# Altium PCB switch-box.PcbDoc (part 2 of 2)
Units mil, origin at the board's own origin, x right, y up, seen from the top; angles counter-clockwise.
Board outline 6910 x 3465 mil, 2 copper layers (Top Layer, Bottom Layer), stack 57 mil thick; 96 components, 105 nets, 379 pads, 100 vias.
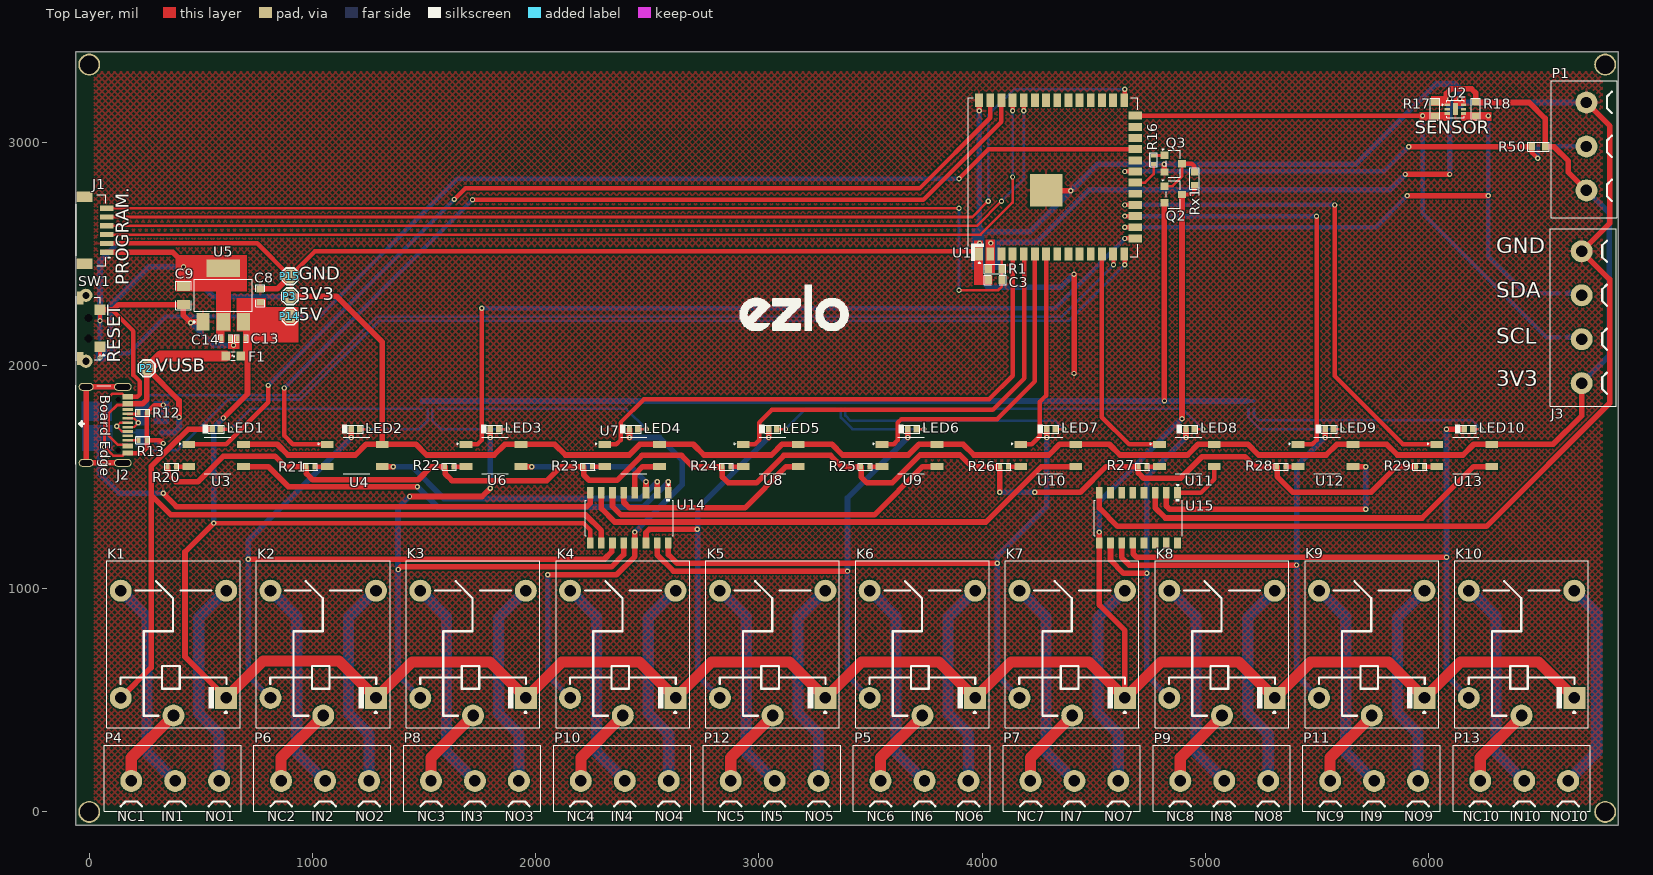
[diagram p0: Top Layer view]

## Part data (continued)
U3 U4 U6 U7 U8 U9 U10 U11 U12 U13: "Optoisolator Transistor Output 3750Vrms 1 Channel", Case/Package=SMD/SMT, Collector Emitter Saturation Voltage=200mV, Collector Emitter Voltage (VCEO)=80V, Current Transfer Ratio=600%, Forward Current=50mA, Forward Voltage=1.4V, Isolation Voltage=3.75kV, LCSC Part Number=C84196, Manufacturer=Isocom, Max Operating Temperature=100°C, Min Operating Temperature=-55°C, Power Dissipation=170mW, Reverse Breakdown Voltage=6V, Category=Optocouplers, ComponentLink1Description=https://datasheet.ciiva.com/26895/getdatasheetpartid-624485-26895717.pdf?src-supplier=Verical, ComponentLink1URL=https://datasheet.ciiva.com/26895/getdatasheetpartid-624485-26895717.pdf?src-supplier=Verical, ComponentLink2Description=https://datasheet.ciiva.com/29301/183289-da-01-en-optokoppler-is181-gb-29301106.pdf?src-supplier=Conrad, ComponentLink2URL=https://datasheet.ciiva.com/29301/183289-da-01-en-optokoppler-is181-gb-29301106.pdf?src-supplier=Conrad, Fall Time=18000ns, Item Type=Optocoupler, Lead Free="Lead Free", Manufacturer Part Number=IS181GB, Mount="Surface Mount", Number of Elements=1, Number of Pins=4, Pricing 1="1=0.55080, 10=0.34190, 25=0.33860, 50=0.33530, 100=0.19360, 250=0.19160, 500=0.18960, 1000=0.14750 (USD)", Radiation Hardening=No, Rise Time=18000ns, RoHS=Yes, RoHS Compliant=Yes, Stock 1=2922, Supplier 1="Arrow Electronics", Supplier Part Number 1=IS181GB
U5: "IC REG LINEAR 3.3V 1.2A SOT223", Case/Package=TO-261-4, Dropout Voltage=600mV, LCSC Part Number=C435835, Manufacturer=STMicroelectronics, Max Input Voltage=18V, Max Operating Temperature=125°C, Min Operating Temperature=-40°C, Min Output Voltage=3.3V, Output Current=1.2A, Power Supply Rejection Ratio (PSRR)=65dB, Quiescent Current=500uA, Supplier Part Number 1=497-17239-6-ND, ComponentLink1Description=LCSC, ComponentLink1URL=https://www.lcsc.com/product-detail/Linear-Voltage-Regulators-LDO_STMicroelectronics-LDL1117S33R_C435835.html, Manufacturer Part Number=LDL1117S33R, Mount="Surface Mount", Number of Regulators=1, Output Configuration=Positive, Output Type=Fixed, Packaging="Tape and Reel", Pricing 1="1=0.45, 10=0.362, 100=0.2465, 500=0.1849, 1000=0.13867 (USD)", Stock 1=13064, Supplier 1=Digi-Key
U14 U15: "TRANS 7NPN DARL 50V 0.5A 16SOIC", Case/Package=SOIC, Collector Emitter Breakdown Voltage=50V, Collector Emitter Saturation Voltage=1.1V, Collector-emitter Voltage-Max=1.6V, Current Rating=500mA, LCSC Part Number=C908113, Manufacturer="Texas Instruments", Max Operating Temperature=70°C, Max Power Dissipation=25W, Min Operating Temperature=-20°C, Package Quantity=40, Category="Integrated Circuits (ICs)", Collector Emitter Voltage (VCEO)=50V, ComponentLink1Description=https://datasheet.ciiva.com/15139/getdatasheetpartid-47909-15139875.pdf?src-supplier=Verical, ComponentLink1URL=https://datasheet.ciiva.com/15139/getdatasheetpartid-47909-15139875.pdf?src-supplier=Verical, ComponentLink2Description=https://datasheet.ciiva.com/1193/1908148-1193405.pdf?src-supplier=Element14, ComponentLink2URL=https://datasheet.ciiva.com/1193/1908148-1193405.pdf?src-supplier=Element14, ComponentLink3Description=https://datasheet.ciiva.com/1702/uln2003a-1702173.pdf?src-supplier=Digi-Key, ComponentLink3URL=https://datasheet.ciiva.com/1702/uln2003a-1702173.pdf?src-supplier=Digi-Key, ComponentLink4Description=https://datasheet.ciiva.com/14424/ulq2003a-14424058.pdf?src-supplier=Avnet, ComponentLink4URL=https://datasheet.ciiva.com/14424/ulq2003a-14424058.pdf?src-supplier=Avnet, Contact Plating=Gold, Emitter Base Voltage (VEBO)=50V, Height=1.58mm, Item Type=IC, Lead Free="Lead Free", Length=9.9mm, Manufacturer Part Number=ULN2003AD, Max Collector Current=500mA, Mount="Surface Mount", Number of Drivers=7, Number of Elements=7, Number of Pins=16, Output Current=500mA, Packaging=Rail/Tube, Polarity=NPN, Pricing 1="1=1.68680, 10=1.54200, 100=1.39890, 500=1.31050, 1000=1.23410 (USD)", Radiation Hardening=No, Reach SVHC Compliant=Yes, RoHS=Yes, RoHS Compliant=Yes, Series="Automotive, AEC-Q100", Stock 1=228, Supplier 1="Arrow Electronics", Supplier Part Number 1=ULN2003AD, Voltage Rating (DC)=50V, Weight=0.004998oz, Width=3.91mm

## Free pads (board coordinates)
  round 98.43 hole 82.68: MH1(0,3348) MH2(0,0) MH3(6791,0) MH3(6791,3348)

## Via types
v1: diameter 23.62, hole 11.81, Top Layer to Bottom Layer, tented both sides, 100 vias

## Nets (pads, with @x,y where several pads share a name; then routed paths per layer and width w, separated by ;. In a path a pad name is that pad's centre, name@x,y a point inside that pad or via, vN(x,y) a via of type N, cw(c..) or ccw(c..) an arc to the next point about the centre after c; other vN are vias at no path point)
3V3: C1.1 C2.1 C5.1 C9.1 C14.1 J1.1 J3.1 P1.1 P3.1 R1.2 R2.2 R17.2 R18.2 R50.2 U1.2 U2.1 U3.4 U4.4 U5.2 U5.4 U6.4 U7.4 U8.4 U9.4 U10.4 U11.4 U12.4 U13.4 | length 13717.9
  Top Layer w10: R17.2@6039.54,3168.15 U2.1
  Top Layer w25: J1.1 373.43,2507.57 422,2459 v1(422,2442) C9.1 ; U5.2 600.55,2357.55 ; U3.4 842.09,1647 890.09,1599 1192.33,1599 1240.33,1647 U4.4 ; v1(899,2308) 901,2310 1107,2310 1312.54,2104.46 U4.4 ; R1.2 4030.5,2434.5 4030.5,2455.5 ; U1.2@4033.18,2494.3 U1.2@4038.39,2499.51 ; v1(5896,2856) v1(6094,2856) ; 6080,3202 6080,3219 6100,3239 6193,3239 6211,3221 6211,3178 6451,3178 6522,3107 R50.2 6562,2980 6626,2916 6626,2865.3 P1.1 ; J3.1 6685.64,1774.64 6558,1647 U13.4 6202,1647 6154,1599 5860,1599 5812,1647 U12.4 5589,1647 5541,1599 5238.76,1599 5190.76,1647 U11.4 4967.76,1647 4919.76,1599 4617.52,1599 4569.52,1647 U10.4 4346.52,1647 4298.52,1599 3963,1599 3915,1647 U9.4 3717,1647 3669,1599 3375.05,1599 3327.05,1647 U8.4 3104.05,1647 3056.05,1599 2753.81,1599 2705.81,1647 U7.4 2467,1647 2419,1599 2132.57,1599 2084.57,1647 U6.4 1861.57,1647 1813.57,1599 1511.33,1599 1463.33,1647 U4.4
  Bottom Layer w25: R2.2 97,2274 265,2442 v1(422,2442) 556,2308 v1(899,2308) ; 4054,2552 4054.5,2552.5 4245.5,2552.5 4481,2788 5828,2788 v1(5896,2856) ; v1(6094,2856) v1(6094,3194) ; J3.1 6809,2044.23 6809,2682.3 P1.1
  other v1: 4038.39,2548.31
5V: C8.1 C13.1 F1.2 K1.1 K2.1 K3.1 K4.1 K5.1 K6.1 K7.1 K8.1 K9.1 K10.1 P14.1 Q2.3 Rx1.1 U5.3 U14.9 U15.9 | length 13300.1
  Top Layer w20: v1(558,1294) 2213,1294 2244,1263 U14.9 ; Q2.3 4939,2766 4951,2778 4951,2808 Rx1.1@4952,2809
  Top Layer w25: v1(558,1294) 429,1165 429,695.27 K1.1 ; v1(601,1765) 709,1873 709,2035 702,2042 F1.2 ; v1(4525,1253.8) U15.9 4525,927 4639.63,812.37 K7.1 ; v1(4895.37,1762) Q2.3
  Top Layer w50: K1.1 778.79,676 1119.29,676 K2.1 1445.81,672 1794.3,672 K3.1 2116.82,672 2465.32,672 K4.1 2787.84,672 3136.34,672 K5.1 3458.86,672 3807.35,672 K6.1 4129.87,672 4478.37,672 K7.1 4800.89,672 5149.39,672 K8.1 5471.91,672 5820.4,672 K9.1 6142.92,672 6491.42,672 K10.1
  Bottom Layer w25: v1(558,1294) 558,1722 v1(601,1765) ; v1(4525,1253.8) 4525,1391.63 v1(4895.37,1762)
Cath_1: R20.2 U3.2 | length 56.7
  Top Layer w20: R20.2 U3.2
Cath_2: R21.2 U4.2 | length 56.7
  Top Layer w20: R21.2 U4.2
Cath_3: R22.2 U6.2 | length 56.7
  Top Layer w20: R22.2 U6.2@1687.69,1547
Cath_4: R23.2 U7.2 | length 56.7
  Top Layer w20: R23.2 U7.2@2308.91,1547
Cath_5: R24.2 U8.2 | length 56.7
  Top Layer w20: R24.2 U8.2
Cath_6: R25.2 U9.2 | length 56.7
  Top Layer w20: R25.2 U9.2@3551.35,1547
Cath_7: R26.2 U10.2 | length 56.7
  Top Layer w20: R26.2 U10.2@4172.58,1547
Cath_8: R27.2 U11.2 | length 56.7
  Top Layer w20: R27.2 U11.2@4793.8,1547
Cath_9: R28.2 U12.2 | length 56.7
  Top Layer w20: R28.2 U12.2@5415.02,1547
Cath_10: R29.2 U13.2 | length 56.7
  Top Layer w20: R29.2 U13.2@6036.24,1547
Data: R6.2 R50.1 U1.21 | length 2032.4
  Top Layer w20: v1(4638.8,2869.2) U1.21 U1.21@4687.61,2869.2 ; R50.1 6462,2954.02 6487.52,2928.5 v1(6488.5,2928.5)
  Top Layer w25: v1(5911,2980) R50.1
  Bottom Layer w20: v1(4638.8,2869.2) 5800.2,2869.2 v1(5911,2980) ; v1(6488.5,2928.5) R6.2
EN_: C3.2 J1.6 R1.1 U1.3 | length 4530.9
  Top Layer w12: J1.6 v1@3896,2704.43 ; v1(3896,2337) 4071,2337 4088,2354 C3.2 4087.2,2383.8 4087.2,2498.71 U1.3
  Bottom Layer w12: v1(3896,2337) v1(3896,2704.39)
GND: C1.2 C2.2 C3.1 C4.1 C5.2 C8.2 C9.2 C10.2 C11.2 C12.2 C13.2 C14.2 D1.1 J1.2 J2.A1/B12 J2.B1/A12 J3.4 P1.3 P15.1 Q3.2 R12.1 R13.1 R14.1 SW1.2 U1.1 U1.40 U1.41 U2.6 U2.7 U5.1 U14.8 U15.8 | length 18550
  Top Layer w10: U2.7 6119.66,3162.13 6125.69,3168.15 U2.6
  Top Layer w12: J2.B1/A12 161.19,1607.86 149.19,1595.86 107.14,1595.86 v1(68,1635) 68,1838 104,1874 147.02,1874 161.19,1859.83 J2.A1/B12
  Top Layer w20: v1(48.18,2200.6) SW1.2 ; J1.2 v1(126.51,2546.94) 752.06,2546.94 P15.1 1011.03,2512.03 3978.68,2512.03 3986.39,2504.31 U1.1 ; 94.58,2247 104,2247 198,2153 198,1957 227,1928 227,1871.54 215.28,1859.83 J2.A1/B12 ; J2.B1/A12 235.86,1607.86 258.5,1630.5 R13.1 ; v1(331,1651) 330.02,1651 316.02,1665 R13.1 ; v1(331,1823) 330.31,1822.31 291.31,1822.31 258.5,1789.5 R12.1 R13.1 ; 3988.39,2401.75 3988.39,2415 ; U1.1@3988.39,2499.51 v1(3988.39,2548.31) ; C3.1@4023,2390.04 4028,2385.04 C3.1
  Top Layer w25: SW1.2 107.4,2249.4 131,2273 C9.2 422,2224.2 v1(455.2,2191) ; v1(331,1428) 391,1368 2229.36,1368 2244,1382.64 U14.8 ; v1@455.2,2196 U5.1 ; C8.2 842,2343 P15.1 ; v1(3986.39,3141.69) U1.40 ; U1.41@4288.39,2784.94 4290.34,2783 v1(4397,2783) ; v1(4411.63,1964.58) v1(4411.63,2408.58) ; U15.8 4525,1361 4607,1279 6259,1279 6811,1831 6811,2386.07 J3.4 6812,2637.78 6812,3073 P1.3 ; v1(4816,2901) 4816,2867.23 Q3.2
  Bottom Layer w12: 67,1665 68,1664 v1(68,1635) ; C11.2 v1(331,1651) ; C12.2 v1(331,1823)
  Bottom Layer w20: C4.1@47,2120.5 47.18,2120.5 C4.1@48.18,2121.5
  Bottom Layer w22: C4.1@48.18,2121.5 v1(48.18,2200.6)
  Bottom Layer w25: 46,1640 46,1515 133,1428 v1(331,1428) ; v1(48.18,2200.6) 48.18,2468.62 v1(126.51,2546.94) ; v1(455.2,2191) 555.2,2091 v1(646,2091) ; 3986,2445 3987.5,2443.5 3987.5,2389.5 4026,2351 4354.06,2351 v1(4411.63,2408.58) ; 3986.39,2586.32 3986.39,2599.39 ; v1(3986.39,3141.69) 3986.39,2599.39 ; v1(3988.39,2548.31) 3989.86,2549.78 3989.86,2587.86 ; 3989.95,2600 4214,2600 v1(4397,2783) 4515,2901 v1(4816,2901) 5673,2901 6033,3261 6119,3261 6140,3240 v1(6140,3194) 6140,3172 6145,3167 ; 3989.95,2602.95 3986.39,2599.39 ; 3997.5,2583.5 3993.1,2579.1 3993.1,2543.6 3981,2531.5 3981,2594 3986.39,2599.39 ; 6145,3178 P1.3
GND_1: R20.1 R21.1 R22.1 R23.1 R24.1 R25.1 R26.1 R27.1 R28.1 R29.1 | length 6584.9
  Top Layer w25: R20.1 351.5,1515.5 388,1479 486,1479 601,1594 832,1594 879,1547 R21.1 972.72,1516.28 1001,1488 1474,1488 1533,1547 R22.1 1593.94,1515.06 1625,1484 2050,1484 2113,1547 2202.67,1547 ; R23.1 2215.17,1509.83 2240,1485 2364,1485 2476,1597 2653,1597 2703,1547 R24.1 2836.39,1500.61 2863,1474 2989,1474 3112,1597 3321,1597 3371,1547 R25.1 3457.61,1500.39 3484,1474 3597,1474 3722,1599 3900,1599 3952,1547 R26.1 v1(4078.83,1432) ; v1(4235,1432) 4440,1432 4555,1547 R27.1 4700.06,1517.94 4723,1495 4889,1495 4986,1592 5177,1592 5222,1547 R28.1 5321.28,1502.72 5391,1433 5743,1433 5857,1547 R29.1
  Bottom Layer w25: v1(4078.83,1432) v1(4235,1432)
IN_1: K1.3 P4.2 | length 953.1
  Bottom Layer w50: K1.3 258,874.15 258,266 P4.2
IN_2: K2.3 P6.2 | length 953.1
  Bottom Layer w50: K2.3@812.44,991.06 929.35,874.15 929.35,266 P6.2
IN_3: K3.3 P8.2 | length 953.1
  Bottom Layer w50: K3.3@1483.79,991.06 1600.7,874.15 1600.7,266 P8.2
IN_4: K4.3 P10.2 | length 953.1
  Bottom Layer w50: K4.3@2155.14,991.06 2272.05,874.15 2272.05,266 P10.2
IN_5: K5.3 P12.2 | length 953.1
  Bottom Layer w50: K5.3@2826.49,991.06 2943.4,874.15 2943.4,266 P12.2
IN_6: K6.3 P5.2 | length 953.1
  Bottom Layer w50: K6.3@3497.84,991.06 3614.75,874.15 3614.75,266 P5.2
IN_7: K7.3 P7.2 | length 953.1
  Bottom Layer w50: K7.3@4169.19,991.06 4286.1,874.15 4286.1,266 P7.2
IN_8: K8.3 P9.2 | length 953.1
  Bottom Layer w50: K8.3@4840.54,991.06 4957.45,874.15 4957.45,266 P9.2
IN_9: K9.3 P11.2 | length 953.1
  Bottom Layer w50: K9.3@5511.89,991.06 5628.8,874.15 5628.8,266 P11.2
IN_10: K10.3 P13.2 | length 953.1
  Bottom Layer w50: K10.3@6184.24,991.06 6301.15,874.15 6301.15,266 P13.2
IO0_: J1.5 U1.27 | length 5072.6
  Top Layer w12: J1.5 3956.06,2665.06 v1(4027,2736)
  Top Layer w20: U1.27@4638.39,3188.49 v1(4638.39,3237.29)
  Bottom Layer w12: v1(4027,2736) 4027,3122 4142.29,3237.29 v1(4638.39,3237.29)
IO12: R16.2 U1.20 | length 142
  Top Layer w12: U1.20@4687.61,2819.2 4729.2,2819.2 4768,2858 R16.2
IO_1: U1.39 U3.1 | length 4319.9
  Top Layer w20: U3.1 614,1647 801.83,1834.83 v1(801.83,1910.81) ; v1(1635,2743.98) 1684.02,2793 3719,2793 4036.39,3110.39 U1.39
  Bottom Layer w20: v1(801.83,1910.81) v1(1635,2743.98)
IO_2: U1.38 U4.1 | length 4226.4
  Top Layer w20: v1(873,1899) 873,1686 912,1647 U4.1 ; v1(1717,2743) 3737,2743 4086.39,3092.39 U1.38
  Bottom Layer w20: v1(873,1899) 1692,2718 v1(1717,2743)
IO_3: U1.15 U6.1 | length 3725.8
  Top Layer w20: U6.1 1739.65,1647 1758.75,1666.1 v1(1758.75,2256.75) ; v1(4638.8,2569.2) U1.15
  Bottom Layer w20: v1@1758.75,2257 4326.61,2257 v1(4638.8,2569.2)
IO_4: U1.4 U7.1 | length 2545.6
  Top Layer w20: U7.1 2360.89,1647 2379.99,1666.1 2379.99,1744.23 2484.76,1849 4031,1849 4136.39,1954.39 U1.4
IO_5: U1.5 U8.1 | length 1983.9
  Top Layer w20: U8.1 2982.13,1647 3001.23,1666.1 3001.23,1744.23 3058,1801 4047,1801 4188,1942 4188,2497.91 U1.5
IO_6: U1.6 U9.1 | length 1417.8
  Top Layer w20: U9.1 3603.37,1647 3622.47,1666.1 3622.47,1744.23 3638.24,1760 4067,1760 4236.39,1929.39 U1.6
IO_7: U1.7 U10.1 | length 928.5
  Top Layer w20: U10.1 4222,1647 4258,1683 4258,1836.8 4286.39,1865.2 U1.7
IO_8: U1.12 U11.1 | length 1038.8
  Top Layer w20: U1.12 4536.39,1768.61 4658,1647 U11.1
IO_9: U1.17 U12.1 | length 2003.5
  Top Layer w20: v1(4638.8,2669.2) U1.17 U1.17@4687.61,2669.2 ; U12.1 5417.15,1649 5419.15,1647 5479,1647 5498,1666 v1(5498,2669)
  Bottom Layer w20: v1(4638.8,2669.2) 5497.8,2669.2 v1(5498,2669)
IO_10: U1.18 U13.1 | length 2337.3
  Top Layer w20: v1(4638.8,2719.2) U1.18 ; v1(5579,2719.2) 5579,1953 5885,1647 U13.1
  Bottom Layer w20: v1(4638.8,2719.2) v1(5579,2719.2)
LED_VCC: Q2.2 R3.1 R3.2 R3.3 R3.4 R4.1 R4.2 R4.3 R4.4 R5.1 R5.2 | length 4602
  Top Layer w25: v1(4816.63,1841.37) Q2.2
  Bottom Layer w20: R5.1 R5.2@5215,1841
  Bottom Layer w25: R3.1 R3.2 R3.3 R3.4 R4.1 R4.2 R4.3 R4.4 R5.1@5183.9,1841
NC_1: K1.4 P4.1 | length 371.4
  Top Layer w50: P4.1 188.15,242.84 K1.4
NC_2: K2.4 P6.1 | length 371.4
  Top Layer w50: P6.1 859.5,242.84 K2.4@1048.66,432
NC_3: K3.4 P8.1 | length 371.4
  Top Layer w50: P8.1 1530.85,242.84 K3.4@1720.01,432
NC_4: K4.4 P10.1 | length 371.4
  Top Layer w50: P10.1 2202.2,242.84 K4.4@2391.36,432
NC_5: K5.4 P12.1 | length 371.4
  Top Layer w50: P12.1 2873.55,242.84 K5.4@3062.71,432
NC_6: K6.4 P5.1 | length 371.4
  Top Layer w50: P5.1 3544.9,242.84 K6.4@3734.06,432
NC_7: K7.4 P7.1 | length 371.4
  Top Layer w50: P7.1 4216.25,242.84 K7.4@4405.41,432
NC_8: K8.4 P9.1 | length 371.4
  Top Layer w50: P9.1 4887.6,242.84 K8.4@5076.76,432
NC_9: K9.4 P11.1 | length 371.4
  Top Layer w50: P11.1 5558.95,242.84 K9.4@5748.11,432
NC_10: K10.4 P13.1 | length 371.4
  Top Layer w50: P13.1 6231.3,242.84 K10.4@6420.46,432
NetJ2_A5: J2.A5 R12.2 | length 47.5
  Top Layer w12: J2.A5@173.03,1783.03 R12.2@220.47,1783.03
NetJ2_B5: J2.B5 R13.2 | length 49.8
  Top Layer w12: J2.B5 217.5,1664.94 220.5,1667.94 R13.2@220.5,1669
NetJ3_2: J3.2 R7.1 | length 85.5
  Bottom Layer w25: R7.1 J3.2@6707,2127
NetJ3_3: J3.3 R8.1 | length 85.9
  Bottom Layer w25: R8.1 6706.15,2323 J3.3@6707,2323.85
NetLED1_1: LED1.1 R3.8 | length 941
  Top Layer w15: LED1.1 v1(633,1715)
  Bottom Layer w12: v1(633,1715) 723.57,1805.57 R3.8
NetLED2_1: LED2.1 R3.7 | length 373.4
  Top Layer w12: LED2.1 v1(1249,1715)
  Bottom Layer w12: v1(1249,1715) 1478,1715 1516.31,1753.31 R3.7
NetLED3_1: LED3.1 R3.6 | length 442
  Top Layer w12: LED3.1 v1(1872.24,1715)
  Bottom Layer w12: R3.6 1536,1754 1575,1715 v1(1872.24,1715)
NetLED4_1: LED4.1 R3.5 | length 1009.9
  Top Layer w12: LED4.1 v1(2495.48,1715)
  Bottom Layer w12: R3.5 2404.91,1805.57 v1(2495.48,1715)
NetLED5_1: LED5.1 R4.8 | length 298.9
  Top Layer w12: LED5.1 v1(3118.72,1715)
  Bottom Layer w12: v1(3118.72,1715) 3209.28,1805.57 R4.8
NetLED6_1: LED6.1 R4.7 | length 467
  Top Layer w12: LED6.1 v1(3738.95,1715)
  Bottom Layer w12: R4.7 3367.16,1766.84 3419,1715 v1(3738.95,1715)
NetLED7_1: LED7.1 R4.6 | length 1071.1
  Top Layer w12: LED7.1 v1(4365.19,1715)
  Bottom Layer w12: R4.6 3386.84,1776.16 3411,1752 4328.19,1752 v1(4365.19,1715)
NetLED8_1: LED8.1 R4.5 | length 1652
  Top Layer w12: LED8.1 v1(4988.43,1715)
  Bottom Layer w12: R4.5 4897.87,1805.57 v1(4988.43,1715)
NetLED9_1: LED9.1 R5.8 | length 516.8
  Top Layer w12: LED9.1 v1(5611.67,1715)
  Bottom Layer w12: R5.8 5192.9,1767.1 5245,1715 v1(5611.67,1715)
NetLED10_1: LED10.1 R5.7 | length 1111.5
  Top Layer w12: LED10.1 v1(6234.91,1715)
  Bottom Layer w12: R5.7 5218,1773 5237,1754 6195.91,1754 v1(6234.91,1715)
NetP1_2: P1.2 R6.1 | length 182.1
  Bottom Layer w20: R6.1 6525.5,2980.15 6526.5,2981.15 P1.2
NetQ2_1: Q2.1 Q3.3 Rx1.2 | length 244.8
  Top Layer w12: Q2.1 4852.4,2803.4 4895.37,2846.37 Q3.3
  Top Layer w20: Q3.3 4939,2904 4951,2892 Rx1.2@4951,2862
NetQ3_1: Q3.1 R16.1 | length 49
  Top Layer w12: R16.1 4768.45,2940.95 4816.18,2940.95 Q3.1
NO_1: K1.5 P4.3 | length 940
  Bottom Layer w50: P4.3 581.85,349.35 490.2,441 490.2,870.39 K1.5@610.86,991.06
NO_2: K2.5 P6.3 | length 940
  Bottom Layer w50: P6.3 1253.2,349.35 1161.55,441 1161.55,870.39 K2.5@1282.21,991.06
NO_3: K3.5 P8.3 | length 940
  Bottom Layer w50: P8.3 1924.55,349.35 1832.9,441 1832.9,870.39 K3.5@1953.56,991.06
NO_4: K4.5 P10.3 | length 940
  Bottom Layer w50: P10.3 2595.9,349.35 2504.25,441 2504.25,870.39 K4.5@2624.91,991.06
NO_5: K5.5 P12.3 | length 940
  Bottom Layer w50: P12.3 3267.25,349.35 3175.6,441 3175.6,870.39 K5.5@3296.26,991.06
NO_6: K6.5 P5.3 | length 940
  Bottom Layer w50: P5.3 3938.6,349.35 3846.95,441 3846.95,870.39 K6.5@3967.61,991.06
NO_7: K7.5 P7.3 | length 940
  Bottom Layer w50: P7.3 4609.95,349.35 4518.3,441 4518.3,870.39 K7.5@4638.96,991.06
NO_8: K8.5 P9.3 | length 940
  Bottom Layer w50: P9.3 5281.3,349.35 5189.65,441 5189.65,870.39 K8.5@5310.31,991.06
NO_9: K9.5 P11.3 | length 940
  Bottom Layer w50: P11.3 5952.65,349.35 5861,441 5861,870.39 K9.5
NO_10: K10.5 P13.3 | length 946.6
  Bottom Layer w50: P13.3 6753,267 6753,890.74 K10.5
OUT_1: U3.3 U14.1 | length 2073.5
  Top Layer w25: U3.3 802,1547 892,1457 v1(1470,1457) ; U14.1 v1(2594,1479)
  Bottom Layer w25: v1(1470,1457) 1561,1366 2481,1366 v1(2594,1479)
OUT_2: U4.3 U14.2 | length 1370.8
  Top Layer w25: U4.3 v1(1361.54,1547) ; U14.2 v1(2544,1479)
  Bottom Layer w25: v1(1361.54,1547) 1445,1547 1588,1404 2469,1404 v1(2544,1479)
OUT_3: U6.3 U14.3 | length 637.4
  Top Layer w25: U6.3 v1(1982.78,1547) ; U14.3 v1(2494,1479)
  Bottom Layer w25: v1(1982.78,1547) 2426,1547 v1(2494,1479)
OUT_4: U7.3 U14.4 | length 207.5
  Top Layer w25: U14.4 2444,1512 2479,1547 U7.3
OUT_5: U8.3 U14.5 | length 911.7
  Top Layer w25: U14.5 2394.5,1429.5 2394.5,1387.5 2420,1362 2937,1362 3122,1547 U8.3
OUT_6: U9.3 U14.6 | length 1619.7
  Top Layer w25: U14.6 2344,1369 2382,1331 3517,1331 3733,1547 U9.3
OUT_7: U10.3 U14.7 | length 2323.3
  Top Layer w25: U14.7 2294,1359 2354,1299 4017,1299 4265,1547 U10.3
OUT_8: U11.3 U15.1 | length 246.8
  Top Layer w20: U15.1 4980,1430 5039.98,1489.98 U11.3
OUT_9: U12.3 U15.2 | length 1206.2
  Top Layer w25: U15.2 4825,1370.64 4839.64,1356 v1(5718,1356) ; U12.3 v1(5718,1547)
  Bottom Layer w25: v1(5718,1356) v1(5718,1547)
OUT_10: U13.3 U15.3 | length 1688.9
  Top Layer w25: U15.3 4775,1362.85 4820.85,1317 5971,1317 6201,1547 U13.3
RET_K1: K1.2 LED1.2 U14.10 | length 3575.1
  Top Layer w25: K1.2 277,646.65 277,1420 ; LED1.2 444,1715 372,1643 277,1548 277,1420 ; U14.10 2294,1261 2224,1331 366,1331 277,1420
RET_K2: K2.2 LED2.2 U14.11 | length 3120.1
  Top Layer w25: v1(712,1132) 2307,1132 2341.54,1166.54 2341.54,1202.34 U14.11 ; v1(1173.6,1677.27) LED2.2
  Bottom Layer w25: K2.2 712,610.85 v1(712,1132) 712,1215.67 v1(1173.6,1677.27)
RET_K3: K3.2 LED3.2 U14.12 | length 2696.8
  Top Layer w25: v1(1384,1086) 1396,1098 2339,1098 2394,1153 U14.12 ; v1(1435,1413) 1759.57,1413 v1(1796.84,1450.27) ; v1(1796.84,1677.27) LED3.2
  Bottom Layer w25: v1(1435,1413) 1383.02,1361.02 1383.02,610.85 K3.2 ; v1(1796.84,1450.27) v1(1796.84,1677.27)
RET_K4: K4.2 LED4.2 U14.13 | length 1851.5
  Top Layer w25: v1(2054,1062) 2361,1062 2444,1145 U14.13 v1(2444,1253.8) ; v1(2420.08,1677.27) LED4.2
  Bottom Layer w25: v1@2054.03,1062 2054.03,610.85 K4.2 ; v1(2420.08,1677.27) 2554.73,1677.27 2656,1576 2656,1465.8 v1(2444,1253.8)
RET_K5: K5.2 LED5.2 U14.14 | length 1660.3
  Top Layer w25: U14.14 2494,1251.36 2508.64,1266 v1(2724.09,1266) ; v1(3043.32,1677.27) LED5.2
  Bottom Layer w25: K5.2 2725.05,610.85 2725.05,1359 v1(3043.32,1677.27)
RET_K6: K6.2 LED6.2 U14.15 | length 2293.2
  Top Layer w25: U14.15 2544,1152 2617,1079 v1(3396.6,1079) ; v1(3666.55,1677.27) LED6.2
  Bottom Layer w25: v1@3396.07,1079 3396.07,610.85 K6.2 ; v1(3396.6,1079) 3396.6,1407.32 v1(3666.55,1677.27)
RET_K7: K7.2 LED7.2 U14.16 | length 2878.9
  Top Layer w25: U14.16 2594,1153 2633,1114 v1(4067,1114) ; v1(4289.79,1677.27) LED7.2
  Bottom Layer w25: K7.2 4067.08,610.85 4067.08,1147.08 4289.79,1369.79 v1(4289.79,1677.27)
RET_K8: K8.2 LED8.2 U15.10 | length 1582.4
  Top Layer w25: U15.10 4575,1128 4634,1069 v1(4738,1069) ; v1(4913.03,1677.27) LED8.2
  Bottom Layer w25: K8.2 4738.1,610.85 4738.1,1502.34 v1(4913.03,1677.27)
RET_K9: K9.2 LED9.2 U15.11 | length 2160.3
  Top Layer w25: U15.11 4625,1140 4659,1106 v1(5408,1106) ; v1(5536.27,1677.27) LED9.2
  Bottom Layer w25: K9.2 5409.12,610.85 5409.12,1106 5409.12,1550.12 v1(5536.27,1677.27)
RET_K10: K10.2 LED10.2 U15.12 | length 2783
  Top Layer w25: U15.12 4676.84,1202.97 4676.84,1155.64 4691.48,1141 v1(6080,1141) ; v1(6080.13,1714) LED10.2@6159.21,1714
  Bottom Layer w25: v1(6080.13,1714) 6080.13,610.85 K10.2
RST_: C4.2 R2.1 SW1.1 U1.23 | length 5031.5
  Top Layer w20: v1(48.18,2035.24) SW1.1 ; v1(3896,2837) 4028.2,2969.2 U1.23
  Bottom Layer w20: 97,2054 177,2054 342.5,2219.5 1031.5,2219.5 1649,2837 v1(3896,2837) ; 99,2043 R2.1@99,2058
RXD_: J1.4 U1.36 | length 4547.4
  Top Layer w12: J1.4 3976.19,2625.69 v1(4086.5,2736)
  Top Layer w20: v1(4186.39,3140.69) U1.36@4186.39,3187.49
  Bottom Layer w12: v1(4086.5,2736) 4186.39,2835.89 v1(4186.39,3140.69)
SCL: R7.2 R17.1 U1.26 U2.3 | length 2607.8
  Top Layer w10: R17.1@6039.54,3128.78 U2.3
  Top Layer w20: U1.26@4687.61,3119.2 v1@5972.8,3119.2
  Bottom Layer w20: v1(5973,3119) 5973,2682 6528,2127 R7.2
  Bottom Layer w25: v1(5973,3119) v1@5973,3119.2
SDA: R8.2 R18.1 U1.16 U2.4 | length 2812.3
  Top Layer w10: U2.4 6156,3129 6157.13,3127.87 6201.13,3127.87 R18.1@6211,3118
  Top Layer w20: v1(4638.8,2619.2) U1.16 U1.16@4687.61,2619.2
  Top Layer w25: v1(5904.8,2761.2) v1(6267.2,2761.2)
  Bottom Layer w20: v1(4638.8,2619.2) 5762.8,2619.2 v1(5904.8,2761.2) ; v1(6267,3118) 6267,2487 6431,2323 R8.2
Shell_: C10.1 J2.S1 J2.S2 J2.S3 J2.S4 R14.2 | length 967.6
  Top Layer w25: J2.S1 J2.S2 J2.S3 J2.S4
  Bottom Layer w25: R14.2 -12.5,1773.5 -12.5,1902.61 J2.S3 J2.S4
TXD_: J1.3 U1.37 | length 4575.5
  Top Layer w12: J1.3 3992.32,2586.32 4136.39,2730.39 v1(4136.39,2844.39)
  Top Layer w20: v1(4136.39,3140.69) U1.37@4136.39,3187.49
  Bottom Layer w12: v1(4136.39,2844.39) v1(4136.39,3140.69)
USB_DM: C12.1 D1.4 J2.A7 J2.B7 U1.13 | length 4806.5
  Top Layer w10: J2.A7 173.91,1724.91 201.06,1724.91 v1(219.84,1743.69) 201.06,1762.46 173.91,1762.46 J2.B7
  Top Layer w20: v1(4588.39,2450.71) U1.13@4588.39,2499.51
  Bottom Layer w10: v1(219.84,1743.69) 219.84,1764.06 230.59,1774.8 D1.4
  Bottom Layer w12: C12.1 259.5,1853.5 272,1866 936,1866 1289,2219 4356.69,2219 v1(4588.39,2450.71)
USB_DP: C11.1 D1.3 J2.A6 J2.B6 U1.14 | length 5050.6
  Top Layer w10: J2.B6 172.09,1705.22 146.06,1705.22 v1(123.14,1728.14) 138.69,1743.69 J2.A6
  Top Layer w20: v1(4638.39,2450.71) U1.14@4638.39,2499.51
  Bottom Layer w10: v1(123.14,1728.14) 151.28,1700 D1.3
  Bottom Layer w12: 239,1663 282,1620 394,1620 622,1848 947,1848 1299.51,2200.51 4388.19,2200.51 v1(4638.39,2450.71)
VUSB: D1.2 F1.1 J2.A4/B9 J2.B4/A9 P2.1 | length 1321.1
  Top Layer w12: J2.B4/A9 168.09,1644.27 128.73,1644.27 87,1686 87,1785 125.42,1823.42 168.09,1823.42 J2.A4/B9
  Top Layer w25: J2.A4/B9 238.33,1828.33 258,1848 P2.1@258,1980 ; P2.1@262,1984 402,1844 v1(402,1768)
  Top Layer w50: P2.1@258,1980 262,1984 320,2042 F1.1
  Bottom Layer w25: D1.2 380,1700 402,1722 v1(402,1768)
pads on no net: J1.MP1 J1.MP2 J2.A8 J2.B8 J2.MH R5.3 R5.4 R5.5 R5.6 SW1.3 SW1.4 SW1.5 SW1.6 SW1.MH0 SW1.MH1 U1.8 U1.9 U1.10 U1.11 U1.19 U1.22 U1.24 U1.25 U1.28 U1.29 U1.30 U1.31 U1.32 U1.33 U1.34 U1.35 U2.2 U2.5 U15.4 U15.5 U15.6 U15.7 U15.13 U15.14 U15.15 U15.16

## Polygon pours and split planes (outlines as drawn)
GND on Top Layer "GND_L01_P000" (hatched 45Degree grid 20 track 8, remove dead copper, pour order 0): 22,3315 6778,3315 6778,32 22,32
GND on Bottom Layer "GND_L02_P001" (hatched 45Degree grid 20 track 8, remove dead copper, pour order 1): 22,3315 6778,3315 6778,32 22,32

## Other copper
Top Layer:
  region net SCL: 6096.67,3135.91 5958.67,3135.91 5958.67,3094.91 6096.67,3094.91
  rectangle net SDA: 6144,3095 6282,3136
  rectangle net GND: 3964,2361 4004,2560
  rectangle net 5V: 689,2022 729,2117
  rectangle net GND: 621,2075 673,2139
  region net 5V: 659,2302.5 659,2152 792,2152 792,2302.5
  region net 5V: 937,2261 689,2261 689,2102 937,2102
  rectangle net 3V3: 567,2102 607,2166
  rectangle net 3V3: 567,2153 635,2346
  rectangle net 3V3: 387,2331 706,2494
  rectangle net GND: 6112,3162 6168,3208
  rectangle net 3V3: 6011,3162 6098,3208
  rectangle net GND: 3978,2361 4046,2404
  rectangle net 3V3: 4015,2414 4058,2564
Bottom Layer:
  rectangle net GND: -32.5,1618 104.5,1734.5
  rectangle net Shell_: -34,1751 103,1838
  rectangle net GND: 287,1739 358,1841
  rectangle net USB_DP: 207,1632 270,1716
  rectangle net USB_DM: 205,1731 269,1843
  rectangle net RST_: 27,2018 117,2096
  region net 3V3: 6110,3208 6078,3208 6078,3150 6110,3150
  rectangle net GND: 6124,3150 6156,3208
  rectangle net 3V3: 4024,2427 4082,2565
  region net GND: 4010,2617 3952,2617 3952,2427 4010,2427

## Silkscreen, mask and mechanical layers (free items; w line width, h text height)
Top Overlay:
  drawing of 310 lines, arcs and shapes, not listed
  text "SENSOR" at 5938.9,3018.79 h100
  text "GND" at 6303.96,2477.12 h120
  text "GND" at 938.96,2363.79 h100
  text "PROGRAM." at 198.21,2358.52 h100 r90
  text "SDA" at 6303.96,2279.12 h120
  text "3V3" at 938.96,2271.21 h100
  text "5V" at 938.96,2180.26 h100
  text "SCL" at 6303.96,2072.12 h120
  text "RESET" at 158.21,2012.02 h100 r90
  text "VUSB" at 296.85,1950.79 h100
  text "3V3" at 6303.96,1882.62 h120
  text "NC1" at 125.78,-56.89 h75
  text "IN1" at 322.63,-56.89 h75
  text "NO1" at 519.48,-56.89 h75
  text "NC2" at 797.13,-56.89 h75
  text "IN2" at 993.98,-56.89 h75
  text "NO2" at 1190.83,-56.89 h75
  text "NC3" at 1468.48,-56.89 h75
  text "IN3" at 1665.33,-56.89 h75
  text "NO3" at 1862.18,-56.89 h75
  text "NC4" at 2139.83,-56.89 h75
  text "IN4" at 2336.68,-56.89 h75
  text "NO4" at 2533.28,-56.89 h75
  text "NC5" at 2811.18,-56.89 h75
  text "IN5" at 3008.03,-56.89 h75
  text "NO5" at 3204.88,-56.89 h75
  text "NC6" at 3482.53,-56.89 h75
  text "IN6" at 3679.38,-56.89 h75
  text "NO6" at 3876.23,-56.89 h75
  text "NC7" at 4153.88,-56.89 h75
  text "IN7" at 4350.73,-56.89 h75
  text "NO7" at 4547.58,-56.89 h75
  text "NC8" at 4825.23,-56.89 h75
  text "IN8" at 5022.08,-56.89 h75
  text "NO8" at 5218.93,-56.89 h75
  text "NC9" at 5496.58,-56.89 h75
  text "IN9" at 5693.43,-56.89 h75
  text "NO9" at 5890.28,-56.89 h75
  text "NC10" at 6152.76,-56.89 h75
  text "IN10" at 6364.36,-56.89 h75
  text "NO10" at 6544.59,-56.89 h75
Bottom Overlay:
  drawing of 3070 lines, arcs and shapes, not listed
  text "ZERO CARBON FOOTPRINT" at 3528.24,2021.71 h45
Board Outline:
  the board outline again, w10

## Dimensions
6850,-59 to 6850,3406 on Dimension
-60,-59 to 6850,-59 on Dimension

## Text inside footprints (layer, text, board x,y; h text height)
J2: Top Overlay "Board Edge" at 49,1868 h45 r270